# Altium PCB Zybo_Z7_Pcb.PcbDoc (part 8 of 8)
Units mm, origin at the board's own origin, x right, y up, seen from the top; angles counter-clockwise.
Board outline 122 x 88 mm, 8 copper layers (Top Layer, Layer 2, Layer 3, Layer 4, Layer 5, Layer 6, Layer 7, Bottom Layer), stack 1.625 mm thick; 658 components, 558 nets, 2538 pads, 924 vias.
Unrouted connection lines stored in the file: 1229.
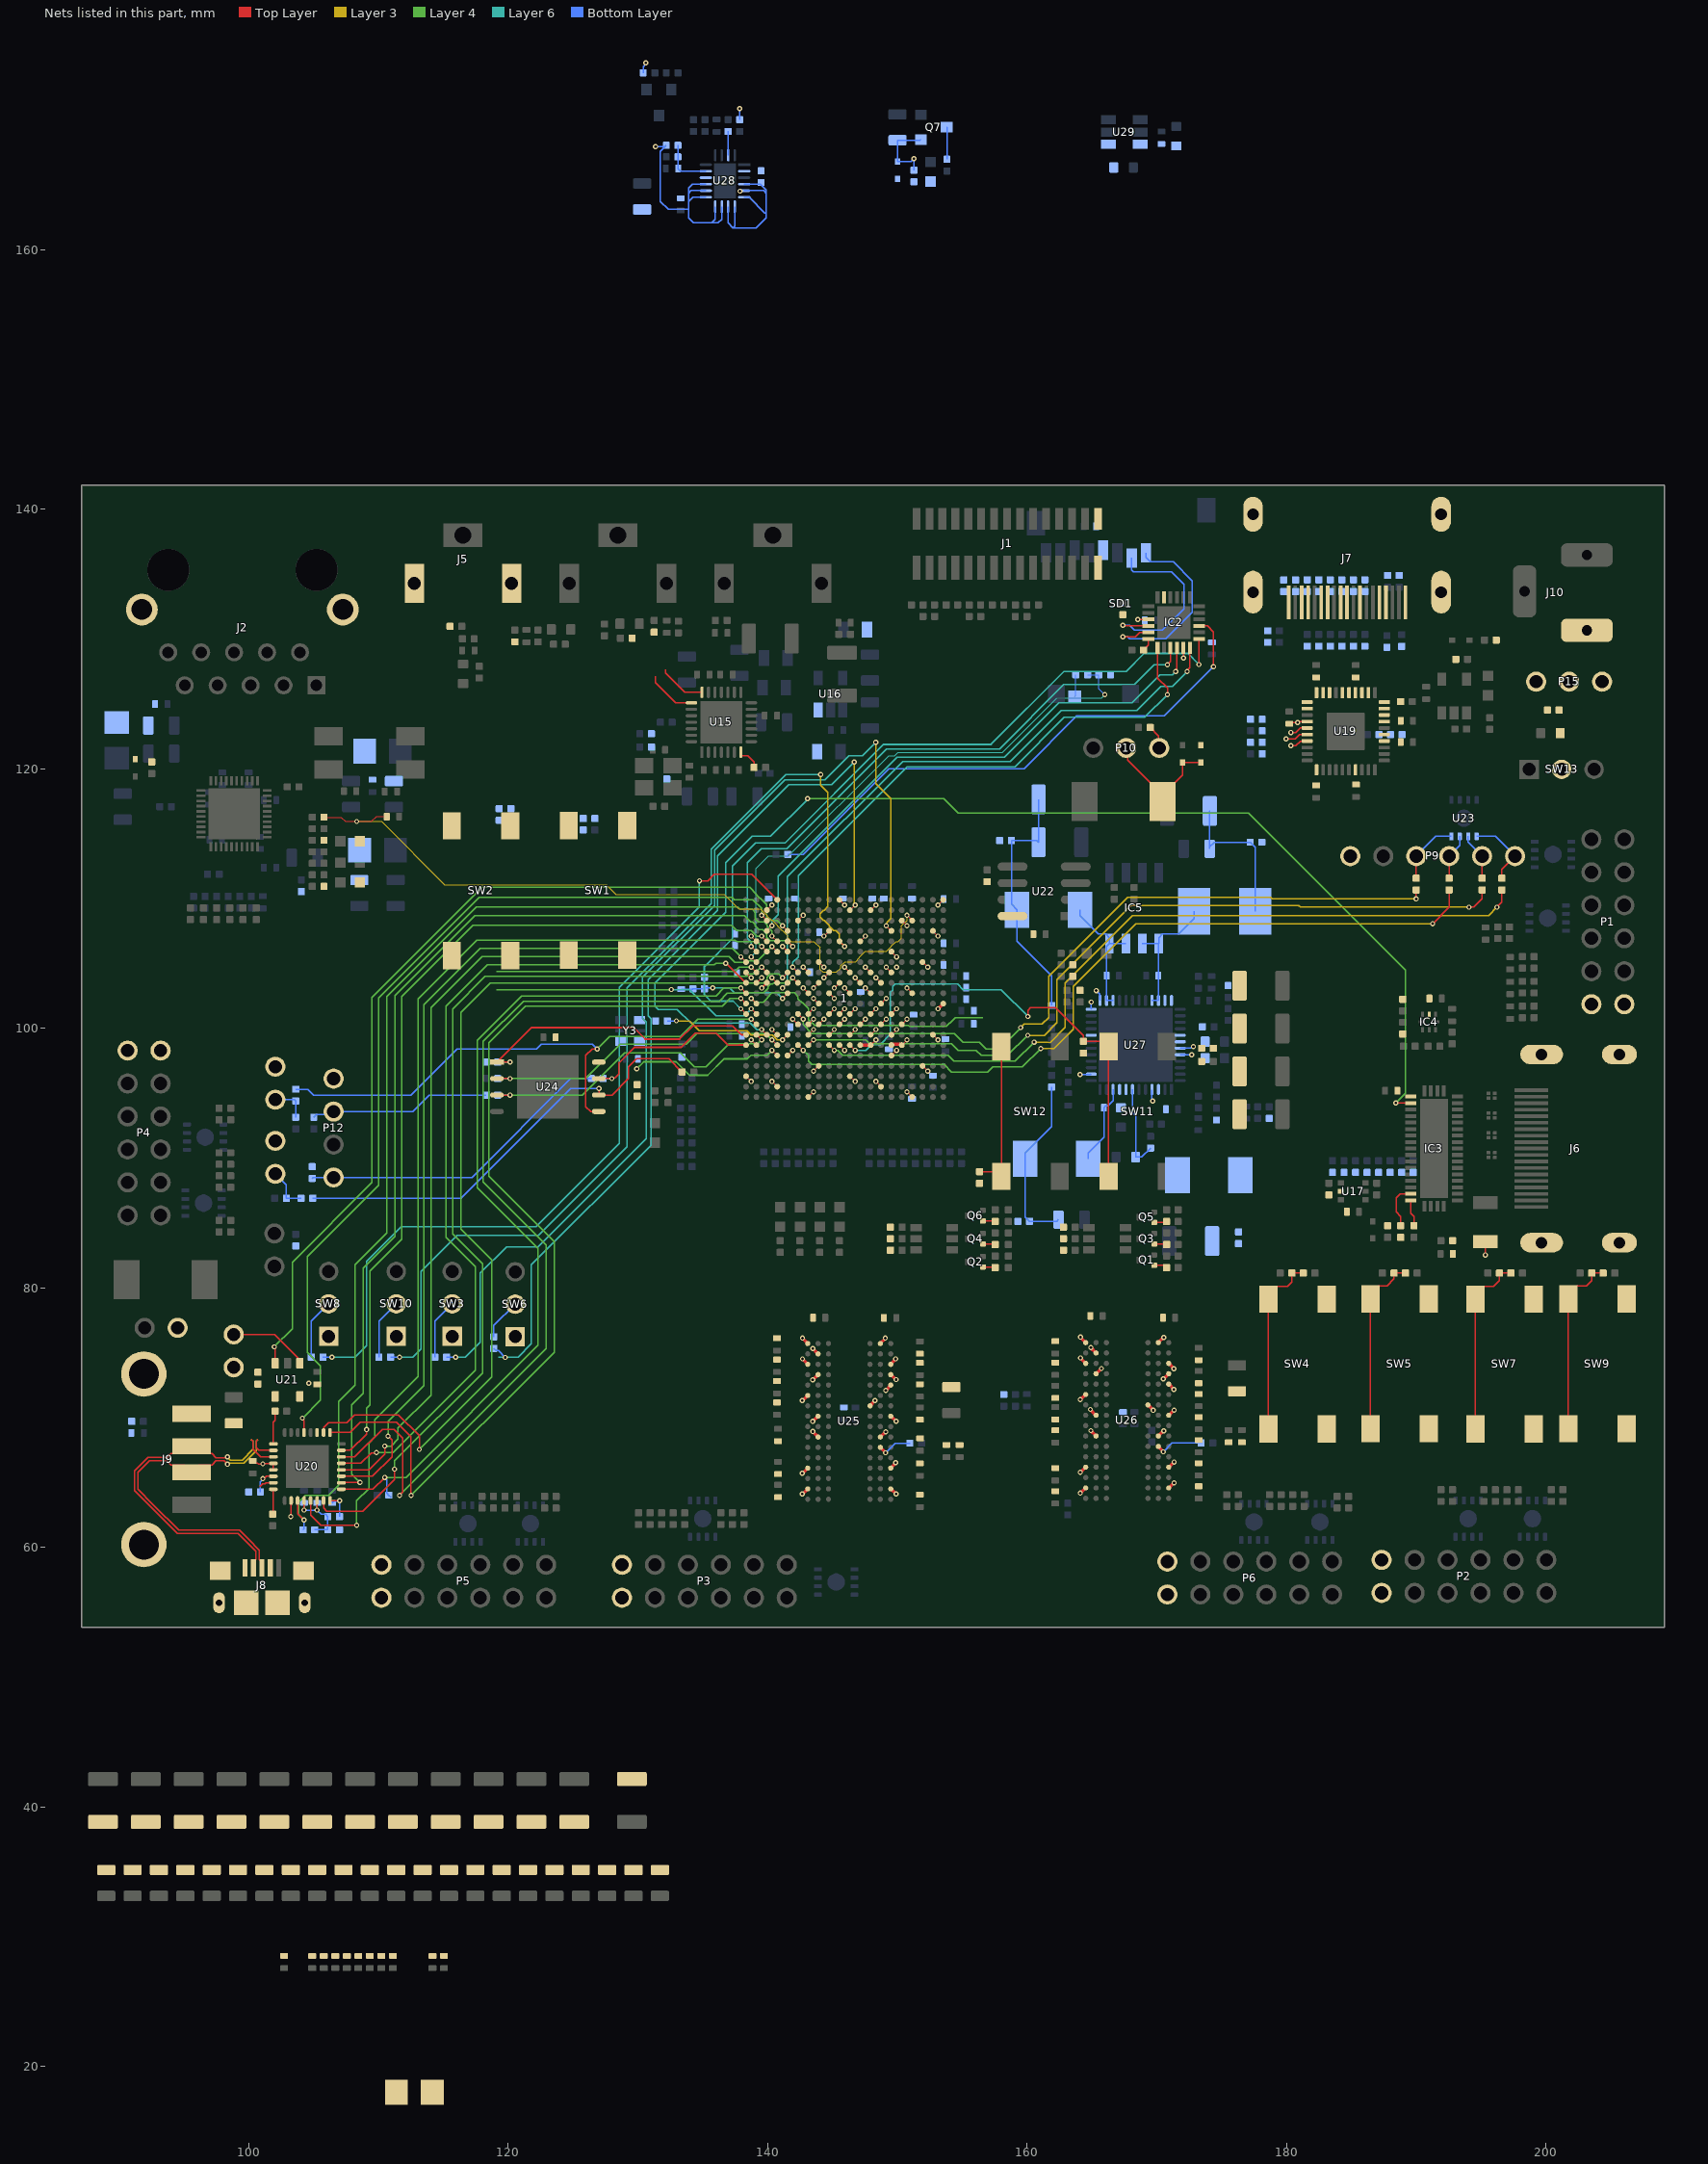
[diagram p13: the nets of this part, all layers, seen from the top]

## Via types
v1: diameter 0.4, hole 0.2, Top Layer to Bottom Layer, 249 vias
v2: diameter 0.4/0.2/0.2/0.2/0.2/0.2/0.2/0.2 (per signal layer), hole 0.2, Top Layer to Bottom Layer, 148 vias
v3: diameter 0.4/0.2/0.4/0.2/0.2/0.2/0.2/0.2 (per signal layer), hole 0.2, Top Layer to Bottom Layer, 136 vias
v4: diameter 0.4/0.2/0.2/0.4/0.2/0.2/0.2/0.2 (per signal layer), hole 0.2, Top Layer to Bottom Layer, 98 vias
v5: diameter 0.4/0.2/0.2/0.2/0.2/0.4/0.2/0.2 (per signal layer), hole 0.2, Top Layer to Bottom Layer, 68 vias
v6: diameter 0.4/0.4/0.2/0.2/0.4/0.2/0.4/0.4 (per signal layer), hole 0.2, Top Layer to Bottom Layer, 62 vias
v7: diameter 0.5, hole 0.2, Top Layer to Bottom Layer, 52 vias
v8: diameter 0.4/0.2/0.2/0.2/0.2/0.2/0.2/0.4 (per signal layer), hole 0.2, Top Layer to Bottom Layer, 31 vias
v9: diameter 0.5, hole 0.3, Top Layer to Bottom Layer, 25 vias
v10: diameter 0.4/0.4/0.2/0.2/0.4/0.4/0.4/0.4 (per signal layer), hole 0.2, Top Layer to Bottom Layer, 20 vias
v11: diameter 0.2/0.2/0.2/0.4/0.2/0.2/0.2/0.4 (per signal layer), hole 0.2, Top Layer to Bottom Layer, 15 vias
v12: diameter 0.2/0.2/0.2/0.2/0.2/0.4/0.2/0.4 (per signal layer), hole 0.2, Top Layer to Bottom Layer, 11 vias
v13: diameter 0.4/0.4/0.4/0.4/0.4/0.4/0.4/0.4 (per signal layer), hole 0.2, Top Layer to Bottom Layer, 5 vias
v14: diameter 0.4/0.2/0.2/0.2/0.2/0.4/0.2/0.4 (per signal layer), hole 0.2, Top Layer to Bottom Layer, 2 vias
v15: diameter 0.2/0.4/0.4/0.4/0.4/0.4/0.4/0.4 (per signal layer), hole 0.2, Top Layer to Bottom Layer, 2 vias

## Nets (pads, with @x,y where several pads share a name; then routed paths per layer and width w, separated by ;. In a path a pad name is that pad's centre, name@x,y a point inside that pad or via, vN(x,y) a via of type N, cw(c..) or ccw(c..) an arc to the next point about the centre after c; other vN are vias at no path point) (continued)
NetIC2_22: IC2.22 SD1.2 | length 14.8
  Top Layer w0.1: v1(167.386,131.064) 167.427,131.023 168.488,131.023 IC2.22@169.353,131.023
  Bottom Layer w0.1: v1(167.386,131.064) 167.894,131.064 168.275,130.683 170.434,130.683 172.085,132.334 172.085,134.23 171.128,135.187 168.216,135.187 168.064,135.339 SD1.2@168.064,136.252
NetIC2_23: IC2.23 SD1.1 | length 15.4
  Top Layer w0.1: v1(167.386,130.175) 168.347,130.175 168.695,130.523 IC2.23@169.353,130.523
  Bottom Layer w0.1: v1(167.386,130.175) 167.767,130.175 167.894,130.048 170.697,130.048 172.72,132.071 172.72,134.493 171.261,135.952 169.514,135.952 169.164,136.302 SD1.1@169.164,136.652
NetIC2_24: IC2.24 R118.2 | length 1
  Top Layer w0.1: R118.2@168.979,129.159 169.353,129.533 IC2.24@169.353,130.023
NetIC3_16: IC3.16 R150.2 | length 3.5
  Top Layer w0.1: R150.2@188.798,84.803 188.798,85.522 188.443,85.877 188.443,86.944 188.753,87.254 IC3.16@189.564,87.254
NetIC3_17: IC3.17 R155.1 | length 2.1
  Top Layer w0.1: IC3.17@189.564,86.754 189.564,85.772 189.814,85.522 R155.1@189.814,84.803
NetJ5_2: J5.2 R129.1
NetJ5_3: J5.3 R131.1
NetJ7_19: J7.19 R156.1
NetP7_2: P7.2 U21.1 | length 6.2
  Top Layer w0.1: P7.2@98.849,76.424 102.024,76.424 103.948,74.499 U21.1@103.948,74.204
NetP10_1: P10.1 R206.2 | length 1.9
  Top Layer w0.1: R206.2@169.487,123.19 170.137,122.54 170.137,121.658 P10.1@170.18,121.615
NetP11_2: P11.2 R251.2 R252.1 | length 2.9
  Bottom Layer w0.1: P11.2@102.057,94.513 103.538,94.513 R252.1@103.632,94.419 R251.2@103.632,93.16
NetP12_1: P12.1 R250.2 R254.1 | length 24.7
  Bottom Layer w0.1: R250.2@104.902,88.45 104.971,88.519 P12.1@106.553,88.519 117.221,88.519 124.841,96.139 R254.1@126.423,96.139
NetP12_3: P12.3 R255.1 R256.1 | length 14
  Bottom Layer w0.1: R256.1@105.029,93.16 105.242,93.373 106.327,93.373 P12.3@106.553,93.599 112.649,93.599 113.919,94.869 R255.1@118.295,94.869
NetP13_2: P13.2 R257.2 R258.1 | length 3.4
  Bottom Layer w0.1: P13.2@102.057,88.798 102.914,87.942 R257.2@102.914,86.919 R258.1@104.046,86.919
NetQ1_1: Q1.1 R74.1 | length 1
  Top Layer w0.1: Q1.1@169.799,81.75 169.809,81.74 170.581,81.74 R74.1@170.748,81.573
NetQ2_1: Q2.1 R76.1 | length 1
  Top Layer w0.1: Q2.1@156.591,81.623 157.49,81.623 R76.1@157.54,81.573
NetQ3_1: Q3.1 R79.1 | length 1
  Top Layer w0.1: Q3.1@169.799,83.401 170.698,83.401 R79.1@170.748,83.351
NetQ4_1: Q4.1 R80.1 | length 1
  Top Layer w0.1: Q4.1@156.591,83.401 157.49,83.401 R80.1@157.54,83.351
NetQ5_1: Q5.1 R81.1 | length 1
  Top Layer w0.1: Q5.1@169.799,85.052 170.671,85.052 R81.1@170.748,85.129
NetQ6_1: Q6.1 R82.1 | length 1
  Top Layer w0.1: Q6.1@156.591,85.179 157.49,85.179 R82.1@157.54,85.129
NetQ7_3: Q7.3 R294.2 | length 2.5
  Bottom Layer w0.1: Q7.3@153.806,169.443 153.822,169.427 R294.2@153.822,166.972
NetR41_1: R41.1 R45.2 SW1.1 SW1.2
NetR42_1: R42.1 R44.2 SW2.1 SW2.2
NetR55_2: R55.2 R69.1 SW4.1 SW4.2 | length 14.1
  Top Layer w0.1: SW4.1@178.598,69.135 SW4.2@178.598,79.135 178.598,79.485 179.248,80.135 180.084,80.135 180.409,80.46 R69.1@180.409,81.153 R55.2@181.287,81.153
NetR56_2: R56.2 SW3.2 | length 4.7
  Bottom Layer w0.1: R56.2@114.358,74.676 114.358,77.441 SW3.2@115.697,78.78
NetR57_2: R57.2 R68.1 SW5.1 SW5.2 | length 14
  Top Layer w0.1: SW5.1@186.472,69.168 SW5.2@186.472,79.168 186.472,79.518 187.122,80.168 187.737,80.168 188.283,80.714 R68.1@188.283,81.153 R57.2@189.161,81.153
NetR59_2: R59.2 R67.1 SW7.1 SW7.2 | length 14.1
  Top Layer w0.1: SW7.1@194.549,69.135 SW7.2@194.549,79.135 194.549,79.485 195.199,80.135 195.959,80.135 196.411,80.587 R67.1@196.411,81.153 R59.2@197.289,81.153
NetR60_2: R60.2 SW6.2 | length 3.2
  Bottom Layer w0.1: R60.2@118.897,76.244 118.897,77.104 SW6.2@120.548,78.755
NetR63_2: R63.2 R66.1 SW9.1 SW9.2 | length 14
  Top Layer w0.1: SW9.2@201.709,79.165 201.709,74.17 201.712,74.167 SW9.1@201.712,69.168 ; SW9.2@201.712,79.168 201.712,79.518 202.362,80.168 203.104,80.168 203.523,80.587 R66.1@203.523,81.153 R63.2@204.401,81.153
NetR64_2: R64.2 SW8.2 | length 4.7
  Bottom Layer w0.1: R64.2@104.833,74.676 104.833,77.441 SW8.2@106.172,78.78
NetR70_2: R70.2 SW10.2 | length 4.7
  Bottom Layer w0.1: R70.2@110.04,74.676 110.04,77.441 SW10.2@111.379,78.78
NetR116_1: R116.1 SD1.9 | length 1.7
  Bottom Layer w0.09: SD1.9@163.664,125.567 163.761,125.664 R116.1@163.761,127.254
NetR123_2: R123.2 U15.7 | length 1.9
  Top Layer w0.1: U15.7@137.939,121.286 137.939,121.077 138.005,121.012 138.475,121.012 138.945,120.541 R123.2@138.945,120.117
NetR124_2: R124.2 U15.22 | length 3.9
  Top Layer w0.1: 131.359,127.152 131.359,126.644 132.907,125.096 U15.22@134.129,125.096
NetR125_2: R125.2 U15.21 | length 3.7
  Top Layer w0.1: 132.121,127.66 132.121,127.406 133.621,125.907 U15.21@134.939,125.907
NetR167_1: R167.1 R172.2 U19.25
NetR168_1: R168.1 R173.2 U19.7 | length 1.4
  Top Layer w0.1: v1(180.34,121.793) 180.721,121.793 181.068,122.14 181.573,122.14 U19.7@181.585,122.151
NetR169_1: R169.1 U19.5 | length 1.4
  Top Layer w0.1: v1(180.34,122.809) 180.721,122.809 181.063,123.151 U19.5@181.585,123.151
NetR170_2: R170.2 U19.30
NetR174_2: R174.2 U19.6 | length 1.8
  Top Layer w0.1: v1(179.959,122.301) 180.66,122.301 181.01,122.651 U19.6@181.585,122.651
NetR189_1: R189.1 U20.22 | length 2
  Top Layer w0.1: v1(101.093,65.309) 101.174,65.309 101.36,65.495 U20.22@101.906,65.495
  Bottom Layer w0.1: R189.1@100.908,64.293 100.908,65.043 101.093,65.228 v1(101.093,65.309)
NetR192_1: R192.1 U20.17 U21.4 | length 2.6
  Top Layer w0.1: U20.17@101.906,67.995 101.906,69.658 102.04,69.792 R192.1@102.04,70.516
NetR195_1: R195.1 U20.24 | length 1.9
  Top Layer w0.1: R195.1@101.855,62.584 101.881,62.61 101.881,64.47 U20.24@101.906,64.495
NetR253_2: R253.2 Y3.4
NetR268_2: R268.2 U25.L8 | length 2.7
  Top Layer w0.254: U25.L8@148.712,67.705 v6@149.094,67.323
  Bottom Layer w0.1: v6(149.094,67.305) 149.836,68.047 R268.2@150.967,68.047
NetR269_2: R269.2 U26.L8 | length 3.7
  Top Layer w0.254: U26.L8@170.116,67.777 v6@170.498,67.396
  Bottom Layer w0.1: v6(170.498,67.377) 171.183,68.062 R269.2@173.412,68.062
OTG_CLK: 1.A11 R191.1 U20.1 | length 69.5
  Top Layer w0.05: v4(137.942,103.118) 1.A11@138.342,102.718
  Top Layer w0.1: U20.1@107.146,64.495 109.577,64.495 v4(110.491,65.409)
  Layer 4 w0.1: v4(110.491,65.409) 112.145,65.409 122.316,75.58 122.316,83.046 117.634,87.728 117.634,99.092 121.031,102.489 136.017,102.489 136.639,103.111 v4@137.942,103.111
  Bottom Layer w0.1: v4(110.491,65.409) 110.491,65.39 110.658,65.223 110.658,64.195 R191.1@110.814,64.039 R191.1@110.98,63.874
OTG_D_N: J8.2 J9.2 U20.19 | length 27.5
  Top Layer w0.1: J9.2@95.607,67.806 95.042,67.241 94.035,67.241 93.754,66.96 92.26,66.96 91.214,65.913 91.214,64.389 94.515,61.087 99.187,61.087 100.572,59.702 100.572,59.103 100.372,58.903 J8.2@100.372,58.428 ; J9.2@96.172,67.241 97.179,67.241 97.487,66.933 v1@98.369,66.933 ; v1(98.369,66.979) v1@98.396,67.005 ; 100.204,68.33 100.331,68.203 100.331,67.595 100.931,66.995 U20.19@101.906,66.995
  Layer 3 w0.1: v1(98.369,66.979) 98.603,66.746 99.508,66.746 100.331,67.568 100.331,68.203 100.204,68.33
OTG_D_P: J8.3 J9.3 U20.18 | length 27.1
  Top Layer w0.1: J9.3@95.607,65.806 95.042,66.371 94.035,66.371 93.696,66.71 92.364,66.71 91.464,65.81 91.464,64.492 92.622,63.334 92.71,63.246 94.619,61.337 99.291,61.337 99.91,60.717 99.999,60.629 100.822,59.806 100.822,59.103 101.022,58.903 J8.3@101.022,58.428 ; J9.3@96.172,66.371 97.179,66.371 97.487,66.679 98.112,66.679 v1(98.369,66.422) ; 100.712,68.33 100.585,68.203 100.585,67.695 100.785,67.495 U20.18@101.906,67.495
  Layer 3 w0.1: v1(98.369,66.422) 98.451,66.422 98.537,66.509 99.63,66.509 100.581,67.459 100.581,68.199 100.712,68.33
OTG_DATA0: 1.A14 U20.3 | length 67.7
  Top Layer w0.05: v4(137.942,105.518) 1.A14@138.342,105.118
  Top Layer w0.1: U20.3@107.146,65.495 109.553,65.495 111.052,66.994 111.052,68.277 v4(110.745,68.584)
  Layer 4 w0.1: v4(110.745,68.584) 110.745,69.724 113.507,72.486 113.507,101.823 117.856,106.172 137.281,106.172 v4@137.942,105.511
OTG_DATA1: 1.D15 U20.4 | length 69.2
  Top Layer w0.05: v4(140.342,106.318) 1.D15@140.742,105.918
  Top Layer w0.1: U20.4@107.146,65.995 109.272,65.995 110.491,67.214 v4(110.491,67.822)
  Layer 4 w0.1: v4(110.491,67.822) 110.973,67.822 111.506,68.355 111.506,69.215 114.046,71.755 114.046,101.6 117.983,105.537 137.033,105.537 137.459,105.111 138.342,105.111 138.442,105.211 139.235,105.211 v4(140.342,106.318)
OTG_DATA2: 1.A12 U20.5 | length 67.4
  Top Layer w0.1: U20.5@107.146,66.495 108.656,66.495 109.456,67.295 109.837,67.295 v4(109.856,67.314) ; v4(136.779,105.029) 136.805,105.029 138.316,103.518 1.A12@138.339,103.518
  Layer 4 w0.1: v4(109.856,67.314) 111.129,67.314 117.49,73.675 117.49,81.649 115.219,83.92 115.219,101.724 118.398,104.902 135.89,104.902 136.017,105.029 v4(136.779,105.029)
OTG_DATA3: 1.F12 U20.6 | length 78.7
  Top Layer w0.05: v4(141.942,103.918) 1.F12@142.342,103.518
  Top Layer w0.1: U20.6@107.146,66.995 108.182,66.995 110.301,69.114 111.196,69.114 111.885,68.425 111.885,64.264 v4(111.634,64.012)
  Layer 4 w0.1: v4(111.634,64.012) 122.942,75.321 122.942,83.306 118.077,88.171 118.077,98.996 121.189,102.108 136.271,102.108 136.874,102.711 138.108,102.711 138.139,102.743 139.7,102.743 140.042,103.085 140.042,103.236 140.218,103.411 140.368,103.411 140.475,103.518 141.549,103.518 v4@141.942,103.911
OTG_DATA4: 1.C16 U20.7 | length 68.2
  Top Layer w0.05: v4(139.542,107.118) 1.C16@139.942,106.718
  Top Layer w0.1: U20.7@107.146,67.495 107.838,67.495 109.094,68.75 v4(109.094,69.092)
  Layer 4 w0.1: v4(109.094,69.092) 109.094,70.74 109.347,70.993 109.347,81.315 111.791,83.758 111.791,102.46 117.281,107.95 137.199,107.95 137.618,107.531 138.753,107.531 139.166,107.118 v4(139.542,107.118)
OTG_DATA5: 1.A10 U20.9 | length 74.5
  Top Layer w0.05: v4(137.942,102.318) 1.A10@138.342,101.918
  Top Layer w0.1: U20.9@106.276,68.865 107.824,68.865 108.627,69.668 111.389,69.668 112.523,68.534 v4(112.523,64.012)
  Layer 4 w0.1: v4(112.523,64.012) 123.571,75.06 123.571,83.566 118.522,88.615 118.522,98.902 121.347,101.727 136.525,101.727 137.109,102.311 v4@137.942,102.311
OTG_DATA6: 1.E13 U20.10 | length 73.7
  Top Layer w0.05: v4(141.142,103.918) 1.E13@141.542,104.318
  Top Layer w0.1: U20.10@105.776,68.865 105.801,68.89 105.801,69.255 106.173,69.627 107.57,69.627 108.178,70.235 111.551,70.235 113.158,68.629 v4(113.158,67.568)
  Layer 4 w0.1: v4(113.158,67.568) 118.745,73.155 118.745,82.169 116.363,84.551 116.363,101.25 118.618,103.505 137.77,103.505 137.776,103.511 138.108,103.511 138.114,103.505 139.7,103.505 139.958,103.763 139.958,103.963 140.217,104.222 140.845,104.222 141.149,103.918 v4@141.138,103.907
OTG_DATA7: 1.C18 U20.13 | length 71
  Top Layer w0.05: v4(139.542,108.718) 1.C18@139.942,108.318
  Top Layer w0.1: v1(104.14,69.977) 104.14,69.896 104.276,69.76 U20.13@104.276,68.865
  Layer 4 w0.1: v1(104.14,69.977) 105.537,71.374 105.537,74.02 104.521,75.036 104.521,82.423 110.013,87.915 110.013,102.362 117.76,110.109 137.273,110.109 137.446,109.935 138.858,109.935 139.542,109.251 v4(139.542,108.718)
OTG_DIR: 1.C13 U20.31 | length 72.9
  Top Layer w0.05: v4(139.542,104.718) 1.C13@139.942,104.318
  Top Layer w0.1: U20.31@105.776,63.625 105.776,63.039 106.014,62.802 108.802,62.802 111.253,65.253 v4(111.253,66.044)
  Layer 4 w0.1: v4(111.253,66.044) 111.253,66.676 118.029,73.452 118.029,81.872 115.727,84.174 115.727,101.513 118.227,104.013 138.417,104.013 138.619,104.214 138.995,104.214 v4@139.533,104.753
OTG_ID: J8.4 U20.23 | length 1.2
  Top Layer w0.1: 100.839,64.674 101.074,64.909 101.259,64.909 101.345,64.995 U20.23@101.906,64.995
OTG_NXT: 1.E16 U20.2 | length 75.6
  Top Layer w0.05: 1.E16@141.542,106.718 v4(141.942,106.318)
  Top Layer w0.1: U20.2@107.146,64.995 107.163,65.012 108.569,65.012 v4(108.586,65.028)
  Layer 4 w0.1: v4(108.586,65.028) 107.95,65.664 107.95,70.993 108.839,71.882 108.839,81.525 111.283,83.969 111.283,102.554 117.44,108.712 138.225,108.712 138.719,108.218 138.866,108.218 139.042,108.042 139.042,107.916 139.34,107.618 139.612,107.618 139.942,107.288 139.942,107.012 140.203,106.751 141.515,106.751 v4@141.941,106.325
OTG_OC: 1.E17 R190.2 U21.3 | length 68.9
  Top Layer w0.05: v4(141.142,107.918) 1.E17@141.542,107.518
  Top Layer w0.1: v1(101.982,75.469) 102.048,75.403 U21.3@102.048,74.204
  Layer 4 w0.1: v1(101.982,75.469) 103.378,76.865 103.378,81.998 109.505,88.125 109.505,102.393 117.983,110.871 138.613,110.871 139.142,110.342 139.142,110.294 139.418,110.018 139.461,110.018 139.942,109.537 139.942,108.597 140.219,108.32 140.734,108.32 v4@141.142,107.911
OTG_RESETN: 1.D16 R194.1 U20.27 | length 81.5
  Top Layer w0.05: v4(140.342,107.118) 1.D16@140.742,106.718
  Top Layer w0.1: U20.27@103.776,63.625 103.776,62.626 v4(104.268,62.134)
  Layer 4 w0.1: v4(104.268,62.134) 103.876,62.526 103.876,63.52 104.395,64.039 106.173,64.039 106.935,64.801 106.935,71.248 108.204,72.517 108.204,81.788 110.648,84.232 110.648,102.458 117.537,109.347 137.682,109.347 137.87,109.159 138.847,109.159 139.042,108.965 139.042,108.474 139.292,108.224 139.729,108.224 139.973,107.98 139.973,107.874 140.042,107.805 140.042,107.794 140.218,107.618 140.229,107.618 140.35,107.497 140.35,107.119 v4@140.342,107.111
  Bottom Layer w0.1: R194.1@104.199,61.372 104.268,61.441 v4(104.268,62.134)
OTG_STP: 1.C15 U20.29 | length 76.6
  Top Layer w0.05: v4(139.542,106.318) 1.C15@139.942,105.918
  Top Layer w0.1: U20.29@104.776,63.625 104.776,62.515 105.565,61.726 v4(108.332,61.726)
  Layer 4 w0.1: v4(108.332,61.726) 108.332,63.624 109.263,64.556 109.263,68.082 109.728,68.547 109.728,69.85 113.058,73.18 113.058,102.263 117.602,106.807 137.49,106.807 137.611,106.687 139.167,106.687 v4@139.542,106.311
OUT1: C211.2 C212.1 L6.2 R276.2 R278.2 | length 11.8
  Bottom Layer w0.1: C212.1@174.091,116.764 174.076,116.749 C211.2@174.076,114.005 ; L6.2@177.585,109.017 177.585,113.964 R278.2@177.198,114.351 174.422,114.351 C211.2@174.076,114.005 ; C211.2@174.076,114.005 C211.2@174.076,113.843 C211.2@174.076,114.005
OUT2: C216.1 C217.1 L7.2 R284.2 R286.2 | length 19.4
  Bottom Layer w0.1: C216.1@160.885,117.653 C217.1@160.885,114.351 160.758,114.478 R284.2@158.794,114.478 158.794,109.57 L7.2@159.22,109.144 159.22,106.743 161.9,104.064 R286.2@161.9,101.778
OUT3: C220.1 L8.2 R290.2 R291.2
OUT4: C223.2 L9.2 R296.2 R297.2 | length 13.6
  Bottom Layer w0.1: R297.2@161.9,95.486 161.9,92.454 159.855,90.409 L9.2@159.855,89.967 159.855,85.476 R296.2@160.191,85.141 162.297,85.141 C223.2@162.424,85.268
OVP: C227.2 R301.1 R303.2 U28.15 | length 4
  Bottom Layer w0.1: R301.1@133.089,168.046 R303.2@133.089,167.157 133.114,167.132 C227.2@133.114,166.268 133.114,166.231 133.288,166.056 U28.15@135.237,166.056
PB0: 1.B13 R41.2 | length 20.3
  Top Layer w0.05: v4(138.742,104.718) 1.B13@139.142,104.318
  Layer 4 w0.1: 119.126,104.394 137.49,104.394 137.808,104.711 v4@138.742,104.711
PB1: 1.B9 R42.2 | length 21.2
  Top Layer w0.05: v5(138.742,101.518) 1.B9@139.142,101.118
  Layer 4 w0.1: 119.126,102.997 v1(132.588,102.997)
  Layer 6 w0.1: v1(132.588,102.997) 133.985,102.997 136.017,100.965 138.196,100.965 v5@138.742,101.511
PG_ALL: C224.2 D18.2 Q7.1 R293.2 U27.20 | length 5.7
  Bottom Layer w0.1: R293.2@151.282,166.141 v1(151.282,167.03) 151.053,166.801 D18.2@150.012,166.801 C224.2@150.012,168.443 151.756,168.443 Q7.1@151.806,168.493
PG_ALL_EDGE: 1.C7 IC3.2 U16.3 | length 94.5
  Top Layer w0.05: v5(139.542,99.918) 1.C7@139.942,99.518
  Top Layer w0.1: v1(188.417,94.259) 189.558,94.259 IC3.2@189.564,94.254
  Layer 4 w0.1: v1(143.078,117.704) 153.568,117.704 154.686,116.586 177.069,116.586 189.154,104.501 189.154,94.996 v1(188.417,94.259)
  Layer 6 w0.1: v5@139.542,99.911 139.17,99.911 138.67,100.411 134.099,100.411 133.037,101.473 131.572,101.473 131.318,101.727 131.318,103.505 136.779,108.966 136.779,112.776 138.802,114.799 140.225,114.799 143.078,117.653 v1(143.078,117.704)
PGOOD: R304.1 U28.2
PROG_B: 1.L6 R201.1 SW11.3 SW11.4 | length 37.4
  Top Layer w0.05: 1.L6@146.342,98.718 v5(146.742,98.318)
  Top Layer w0.1: v1(160.059,100.926) 160.059,101.385 160.274,101.6 162.179,101.6 164.338,99.441 R201.1@164.338,99.002 165.876,99.002 SW11.3@166.279,98.599 SW11.4@166.279,88.599
  Layer 6 w0.1: v5(146.742,98.318) 147.567,98.318 148.015,98.766 148.669,98.766 149.454,99.551 149.454,102.779 149.629,102.954 149.629,103.237 149.816,103.425 154.639,103.425 155.067,102.997 157.988,102.997 v1(160.059,100.926)
PS_CLK: 1.E7 R253.1 | length 10.1
  Top Layer w0.05: v3(141.142,99.118) 1.E7@141.542,99.518
  Layer 3 w0.1: v1(132.969,100.584) 133.985,100.584 134.747,99.822 138.411,99.822 138.722,99.511 140.355,99.511 140.455,99.411 140.466,99.411 140.642,99.236 140.642,99.224 140.748,99.118 v3@141.149,99.118
  Bottom Layer w0.1: R253.1@132.276,100.584 v1(132.969,100.584)
PS_RST: 1.B10 R249.1 SW12.1 SW12.2 | length 32.7
  Top Layer w0.05: v4(138.742,102.318) 1.B10@139.142,101.918
  Top Layer w0.1: R249.1@156.337,88.969 157.654,88.969 SW12.1@158.024,88.599 SW12.2@158.024,98.599
  Layer 4 w0.1: v4@138.742,102.311 139.035,102.018 139.673,102.018 140.011,102.356 140.011,102.405 140.349,102.743 142.089,102.743 142.353,102.479 142.353,102.284 142.676,101.961 142.72,101.961 143.142,101.54 143.142,100.698 143.62,100.22 150.869,100.22 150.921,100.168 153.761,100.168 154.011,100.418 154.06,100.418 154.48,100.838 156.595,100.838
  other v1: 137.871,164.516
PWR_SW1: C208.2 IC5.5 IC5.6 L6.1 U27.33 U27.34 | length 10.5
  Bottom Layer w0.1: IC5.6@168.885,106.559 IC5.5@170.155,106.559 ; U27.33@169.627,102.158 U27.34@170.127,102.158 170.127,104.059 C208.2@170.122,104.064 170.122,106.526 IC5.5@170.155,106.559 ; L6.1@172.885,109.017 172.885,108.471 171.685,107.271 170.43,107.271 170.155,106.996 IC5.5@170.155,106.559
PWR_SW2: C215.1 IC5.7 IC5.8 L7.1 U27.26 U27.27 | length 10.1
  Bottom Layer w0.1: L7.1@164.071,109.144 164.071,108.701 165.501,107.271 166.07,107.271 166.345,106.996 IC5.8@166.345,106.559 ; U27.27@166.627,102.158 U27.26@166.127,102.158 166.127,104.061 C215.1@166.124,104.064 166.124,106.338 IC5.8@166.345,106.559 ; IC5.7@167.615,106.559 IC5.8@166.345,106.559
PWR_SW3: C218.2 L8.1 U27.3
PWR_SW4: C221.2 L9.1 U27.10 | length 6.2
  Bottom Layer w0.1: L9.1@164.706,89.967 164.706,90.409 165.931,91.634 C221.2@165.931,93.904 166.058,94.031 166.218,94.031 166.627,94.44 U27.10@166.627,95.302
RT: R275.1 U27.41
RX0_N: J7.9 R178.1 U19.35
RX0_P: J7.7 R177.1 U19.36
RX1_N: J7.6 R180.1 U19.38
RX1_P: J7.4 R179.1 U19.39
RX2_N: J7.3 R182.1 U19.1
RX2_P: J7.1 R181.1 U19.2
RX_SCL: J7.15 R185.1 U19.29
RX_SDA: J7.16 R186.1 U19.28
RXC_N: J7.12 R176.1 U19.32
RXC_P: J7.10 R175.1 U19.33
SD_CCLK: IC2.9 R234.1 | length 42.8
  Top Layer w0.1: IC2.9@173.253,131.023 173.904,131.023 174.371,130.556 v1(174.371,127.889)
  Bottom Layer w0.1: R234.1@141.547,113.411 142.748,113.411 149.352,120.015 159.766,120.015 163.83,124.079 170.561,124.079 v1(174.371,127.889)
SD_CD: 1.B14 R116.2 R117.1 | length 42.5
  Top Layer w0.05: v5(138.742,105.518) 1.B14@139.142,105.118
  Layer 6 w0.09: v5(138.742,105.518) 139.124,105.9 139.124,112.327 140.081,113.284 141.605,113.284 149.352,121.031 149.786,121.031 150.04,121.285 158.115,121.285 162.306,125.476 165.735,125.476 v1(165.989,125.73)
  Bottom Layer w0.09: R116.2@164.661,127.254 R117.1@165.539,127.254 165.539,126.18 v1(165.989,125.73)
SD_CMD: 1.C17 IC2.4 | length 43.6
  Top Layer w0.05: 1.C17@139.942,107.518 v5(140.342,107.918)
  Top Layer w0.1: v1(171.45,127.508) 171.45,127.589 171.553,127.692 IC2.4@171.553,129.323
  Layer 6 w0.1: v5@140.335,107.918 140.335,108.28 140.808,108.753 140.808,111.725 149.987,120.904 158.242,120.904 162.433,125.095 168.092,125.095 170.251,127.254 171.196,127.254 v1(171.45,127.508)
SD_D0: 1.E12 IC2.6 | length 48.6
  Top Layer w0.05: v5(141.142,103.118) 1.E12@141.542,103.518
  Top Layer w0.1: v1(172.339,127.508) 172.339,127.575 172.553,127.789 IC2.6@172.553,129.323
  Layer 6 w0.1: v5@141.145,103.118 141.531,103.504 141.531,111.686 150.419,120.574 158.699,120.574 162.642,124.516 168.458,124.516 170.307,126.365 171.196,126.365 v1(172.339,127.508)
SD_D1: 1.A9 IC2.7 | length 59.7
  Top Layer w0.05: v5(137.942,101.518) 1.A9@138.342,101.118
  Top Layer w0.1: v1(173.253,128.041) IC2.7@173.253,130.023
  Layer 6 w0.131: v5@137.942,101.511 137.345,102.108 135.636,102.108 135.128,102.616 135.128,104.775 137.287,106.934 137.287,112.522 139.065,114.3 141.351,114.3 148.946,121.895 157.226,121.895 162.839,127.508 167.64,127.508 169.037,128.905 172.389,128.905 v1(173.253,128.041)
SD_D2: 1.F13 IC2.1 | length 45.9
  Top Layer w0.05: v5(141.942,104.718) 1.F13@142.342,104.318
  Top Layer w0.1: IC2.1@170.053,129.323 170.053,127 170.815,126.238 v1(170.815,125.73)
  Layer 6 w0.1: v5@141.942,104.711 141.942,105.087 142.367,105.512 142.367,111.76 150.774,120.167 159.055,120.167 162.865,123.978 169.063,123.978 v1(170.815,125.73)
SD_D3: 1.B15 IC2.3 | length 47.3
  Top Layer w0.05: v5(138.742,106.318) 1.B15@139.142,105.918
  Top Layer w0.1: v1(170.815,128.016) 170.815,128.035 171.053,128.273 IC2.3@171.053,129.323
  Layer 6 w0.1: v5@138.742,106.311 138.742,106.669 138.441,106.97 138.441,112.787 139.52,113.866 141.491,113.866 149.164,121.539 157.883,121.539 162.836,126.492 168.275,126.492 169.799,128.016 v1(170.815,128.016)
SHIELD: C70.1 J2.15 J2.16 J8.6 J8.7 J8.8 J8.9 J8.10 J8.11 J9.5 J9.6 R193.2
SPI_CS: 1.A7 R204.1 U24.1 | length 23.3
  Top Layer w0.1: U24.1@119.137,97.409 v1(120.142,97.409)
  Top Layer w0.131: U24.1@119.137,97.409 121.804,100.076 129.667,100.076 130.556,99.187 133.223,99.187 134.239,100.203 137.287,100.203 137.972,99.518 1.A7@138.342,99.518
  Bottom Layer w0.1: R204.1@119.195,97.409 v1(120.142,97.409)
SPI_DQ0/MODE0: 1.B8 R252.2 U24.5 | length 44.8
  Top Layer w0.05: v4(138.742,100.718) 1.B8@139.142,100.318
  Top Layer w0.1: v1(126.873,98.425) 126.492,98.425 125.984,97.917 125.984,93.98 126.365,93.599 U24.5@126.989,93.599
  Layer 4 w0.1: v1(126.873,98.425) 127.838,99.39 133.299,99.39 134.62,100.711 v4@138.742,100.711
  Bottom Layer w0.1: R252.2@103.632,95.319 104.579,95.319 105.029,94.869 112.522,94.869 116.078,98.425 122.174,98.425 122.555,98.806 126.492,98.806 v1(126.873,98.425)
SPI_DQ1/MODE1: 1.D6 R246.2 U24.2 | length 24.4
  Top Layer w0.05: v4(140.342,99.118) 1.D6@140.742,98.718
  Top Layer w0.1: U24.2@119.137,96.139 v1(120.142,96.139)
  Layer 4 w0.1: v1(120.142,96.139) 125.984,96.139 128.651,98.806 133.731,98.806 134.536,99.611 139.827,99.611 140.327,99.111 v4@140.342,99.111
  Bottom Layer w0.1: R246.2@119.195,96.139 v1(120.142,96.139)
SPI_DQ2/MODE2: 1.B7 R255.2 U24.3 | length 24.6
  Top Layer w0.05: 1.B7@139.142,99.518 v4(139.542,99.118)
  Top Layer w0.1: U24.3@119.137,94.869 v1(120.142,94.869)
  Layer 4 w0.1: v1(120.142,94.869) 125.73,94.869 128.981,98.12 133.274,98.12 134.366,97.028 135.255,97.028 137.049,98.822 139.239,98.822 v4@139.542,99.125
  Bottom Layer w0.1: R255.2@119.195,94.869 v1(120.142,94.869)
SPI_DQ3/MODE3: 1.A6 R254.2 U24.7 | length 14.4
  Top Layer w0.1: U24.7@126.989,96.139 v1(127.993,96.139) 128.042,96.188 128.239,96.188 128.55,96.499 128.55,97.352
  Top Layer w0.131: 128.55,97.352 129.75,98.552 133.35,98.552 134.442,99.644 136.017,99.644 136.943,98.718 137.761,98.718 137.77,98.727 138.333,98.727 1.A6@138.342,98.718
  Bottom Layer w0.1: R254.2@127.323,96.139 v1(127.993,96.139)
SPI_SCK/MODE4: R218.1 R258.2 U24.6 | length 34.6
  Top Layer w0.1: v1(127,95.377) 127,94.88 U24.6@126.989,94.869 128.016,94.869 129.286,96.139 129.286,97.028 129.921,97.663 132.392,97.663 R218.1@133.408,96.647
  Bottom Layer w0.1: R258.2@104.946,86.919 116.383,86.919 124.841,95.377 v1(127,95.377)
SPI_SCLK_FB/VCFG1: 1.D5 R243.2 | length 12.4
  Top Layer w0.05: v4(140.342,98.318) 1.D5@140.742,97.918
  Layer 4 w0.131: v1(129.921,96.901) 130.454,97.434 132.944,97.434 133.832,96.546 133.985,96.393 135.382,96.393 136.652,97.663 138.447,97.663 138.718,97.933 139.964,97.933 v4@140.342,98.311
SW0: 1.R17 R56.1 | length 81.3
  Top Layer w0.05: v3(149.142,107.918) 1.R17@149.542,107.518
  Layer 3 w0.1: v1(148.336,122.047) 148.336,118.872 149.501,117.707 149.501,108.48 149.185,108.164 149.185,107.954 v3@149.142,107.911
  Layer 6 w0.1: v1(115.951,74.676) 116.713,74.676 117.856,75.819 117.856,81.153 119.888,83.185 122.301,83.185 130.632,91.516 130.632,100.508 130.361,100.779 130.361,103.945 135.907,109.491 135.907,113.728 141.331,119.151 144.413,119.151 146.264,121.002 147.291,121.002 v1(148.336,122.047)
  Bottom Layer w0.1: R56.1@115.258,74.676 v1(115.951,74.676)
SW1: 1.K16 R70.1 | length 80.1
  Top Layer w0.05: 1.K16@145.542,106.718 v3(145.942,106.318)
  Layer 3 w0.1: v1(144.094,119.558) 144.094,118.745 144.642,118.197 144.642,109.394 144.366,109.118 144.318,109.118 144.042,108.842 144.042,108.594 144.318,108.318 144.366,108.318 144.732,107.953 144.732,107.897 145.097,107.532 145.287,107.532 145.542,107.277 145.542,106.725 v3@145.942,106.325
  Layer 6 w0.1: v1(111.633,74.676) 112.649,74.676 113.284,75.311 113.284,81.28 116.078,84.074 122.346,84.074 129.159,90.887 129.159,103.124 135.67,109.635 135.67,113.826 141.402,119.558 v1(144.094,119.558)
  Bottom Layer w0.1: R70.1@110.94,74.676 v1(111.633,74.676)
SW2: 1.D20 R64.1 | length 63.3
  Top Layer w0.1: v1(134.747,111.379) 135.382,111.379 135.89,111.887 138.773,111.887 1.D20@140.742,109.918
  Layer 6 w0.1: v1(106.426,74.676) 108.204,74.676 109.093,75.565 109.093,82.042 111.76,84.709 122.155,84.709 128.575,91.129 128.575,103.175 134.747,109.347 v1(134.747,111.379)
  Bottom Layer w0.1: R64.1@105.733,74.676 v1(106.426,74.676)
SW3: 1.L19 R60.1 | length 73
  Top Layer w0.05: 1.L19@146.342,109.118 v3(146.742,109.518)
  Layer 3 w0.1: v1(146.685,120.523) 146.685,109.602 146.742,109.545 v3(146.742,109.518)
  Layer 6 w0.1: 119.253,74.676 120.777,74.676 121.793,75.692 121.793,81.788 131.013,91.008 131.013,100.762 130.81,100.965 130.81,103.759 136.144,109.093 136.144,113.284 141.63,118.77 144.932,118.77 v1(146.685,120.523)
  Bottom Layer w0.1: R60.1@118.897,75.344 119.06,75.181 119.256,75.181 v1(119.786,74.651)
SW_EN: C210.2 R273.2 SW13.2 U28.14
SYNC: R271.1 R272.1 U27.43 | length 1.1
  Bottom Layer w0.1: U27.43@171.827,98.458 171.849,98.48 172.617,98.48 172.74,98.603 v1(172.822,98.603)
SYSCLK: 1.U18 C14.2 R114.2 | length 56.8
  Top Layer w0.05: v3(150.742,108.718) 1.U18@151.142,108.318
  Top Layer w0.09: R114.2@105.809,116.281 107.112,116.281 107.442,115.951 v1(108.331,115.951) 109.474,115.951 109.855,116.332 C14.2@110.65,116.332
  Layer 3 w0.09: v1(108.331,115.951) 110.236,115.951 115.113,111.074 127.584,111.074 128.321,110.338 136.677,110.338 137.792,109.223 139.454,109.223 139.975,108.702 139.975,108.668 140.285,108.357 140.32,108.357 140.768,107.909 140.768,107.875 141.072,107.571 141.107,107.571 141.542,107.135 141.542,106.978 141.82,106.7 143.577,106.7 144.043,106.234 144.043,104.546 144.254,104.336 145.3,104.336 145.628,104.664 145.628,104.821 145.956,105.149 146.79,105.149 147.098,105.457 147.098,105.492 147.543,105.936 149.177,105.936 149.547,106.306 149.547,106.34 149.91,106.703 150.067,106.703 150.33,106.966 150.33,107.923 150.742,108.335 v3(150.742,108.718)
TCK: 1.F9 R200.1 | length 56.5
  Top Layer w0.05: 1.F9@142.342,101.118 v4(142.742,100.718)
  Top Layer w0.1: v1(189.992,109.982) R200.1@189.992,110.675
  Layer 4 w0.1: v4@142.742,100.725 142.742,100.297 143.419,99.62 144.215,99.62 144.218,99.618 154.066,99.618 154.069,99.62 154.38,99.62 155.067,98.933 156.337,98.933 156.845,98.425 157.861,98.425 v1(159.504,100.068)
  Layer 3 w0.1: v1(159.504,100.068) 159.766,100.33 161.163,100.33 161.671,100.838 161.671,104.031 167.749,110.109 178.766,110.109 178.893,109.982 v1(189.992,109.982)
TCK_JTAG: P9.4 R200.2 U23.4 | length 5
  Top Layer w0.1: R200.2@189.992,111.575 P9.4@189.992,113.284
  Bottom Layer w0.1: P9.4@189.992,113.284 191.513,114.805 U23.4@192.7,114.805
TDI_JTAG: P9.2 R197.2 U23.2 | length 3.7
  Top Layer w0.1: R197.2@195.072,111.575 P9.2@195.072,113.284
  Bottom Layer w0.1: U23.2@194,114.805 194,114.356 P9.2@195.072,113.284
TDI_USB/TDO_FPGA: 1.F6 R199.1 | length 59.8
  Top Layer w0.05: 1.F6@142.342,98.718 v4(142.742,98.318)
  Top Layer w0.1: v1(191.262,108.077) 192.532,109.347 R199.1@192.532,110.675
  Layer 4 w0.1: v4(142.742,98.318) 143.142,97.918 143.142,97.494 143.418,97.218 143.422,97.218 143.425,97.214 153.611,97.214 154.178,96.647 156.972,96.647 157.353,97.028 159.639,97.028 v1(161.058,98.447)
  Layer 3 w0.1: v1(161.058,98.447) 162.074,98.447 163.576,99.949 163.576,103.251 168.402,108.077 v1(191.262,108.077)
TDO_JTAG: P9.3 R199.2 U23.3 | length 3.6
  Top Layer w0.1: R199.2@192.532,111.575 P9.3@192.532,113.284
  Bottom Layer w0.1: P9.3@192.532,113.284 193.35,114.102 U23.3@193.35,114.805
TDO_USB/TDI_FPGA: 1.G6 R197.1 | length 60.3
  Top Layer w0.05: 1.G6@143.142,98.718 v4(143.542,99.118)
  Top Layer w0.1: v1(194.056,109.347) 194.437,109.347 195.072,109.982 R197.1@195.072,110.675
  Layer 4 w0.1: v4(143.542,99.118) 147.567,99.118 147.87,98.814 154.17,98.814 154.686,98.298 156.083,98.298 156.464,97.917 158.496,97.917 v1(160.053,99.474)
  Layer 3 w0.1: v1(160.053,99.474) 161.323,99.474 162.306,100.457 162.306,103.768 168.012,109.474 180.93,109.474 181.057,109.347 v1(194.056,109.347)
TMS: 1.J6 R196.1 | length 60.4
  Top Layer w0.05: 1.J6@144.742,98.718 v4(145.142,98.318)
  Top Layer w0.1: v1(196.215,109.347) 196.596,109.728 R196.1@196.596,110.675
  Layer 4 w0.1: v4@145.142,98.325 145.166,98.3 145.413,98.3 145.796,97.917 153.924,97.917 154.351,97.49 159.085,97.49 v1(160.543,98.948)
  Layer 3 w0.1: v1(160.543,98.948) 161.813,98.948 162.941,100.076 162.941,103.514 168.139,108.712 195.58,108.712 v1(196.215,109.347)
TMS_JTAG: P9.1 R196.2 U23.1 | length 5.7
  Top Layer w0.1: R196.2@196.596,111.575 196.596,112.268 P9.1@197.612,113.284
  Bottom Layer w0.1: U23.1@194.65,114.805 196.091,114.805 P9.1@197.612,113.284
UART_RXD_OUT: 1.B12 | length 0.6
  Top Layer w0.05: 1.B12@139.142,103.518 v2(139.542,103.918)
UART_TXD_IN: 1.C12 | length 0.6
  Top Layer w0.1: v2@139.549,103.121 1.C12@139.942,103.515
  other v2: 139.549,103.118
USB5V0: C232.2 J8.1 J9.1 P7.1 P8.1 R189.2
USB_CLK_12M: U20.26 | length 1.2
  Top Layer w0.1: v1(103.252,62.388) 103.264,62.4 103.264,63.613 U20.26@103.276,63.625
VCC1V0: 1.G7 1.G11 1.G13 1.H10 1.H12 1.J7 1.J13 1.K12 1.L7 1.L13 1.M12 1.N7 1.N13 1.P8 1.P12 1.R7 1.R13 C8.2 C108.2 C109.2 C110.2 C111.1 C135.2 C136.2 C137.2 C138.2 C139.2 C140.1 C141.2 C142.2 C143.2 C144.2 C145.2 C146.1 C147.2 C148.2 C149.2 FB8.1 R284.1 U27.14 | length 10.5
  Top Layer w0.05: v2(142.742,103.118) 1.G11@143.142,102.718 ; v2(142.742,104.718) 1.G13@143.142,104.318 ; 1.G7@143.142,99.518 v2(143.542,99.918) ; v2(143.542,102.318) 1.H10@143.942,101.918 ; v2(143.542,103.118) 1.H12@143.942,103.518 ; v2(144.342,103.918) 1.J13@144.742,104.318 ; 1.J7@144.742,99.518 v2(145.142,99.918) ; v2(145.142,103.118) 1.K12@145.542,103.518 ; v2(145.942,104.718) 1.L13@146.342,104.318 ; 1.L7@146.342,99.518 v2(146.742,99.918) ; v2(146.742,103.918) 1.M12@147.142,103.518 ; v2(147.542,104.718) 1.N13@147.942,104.318 ; 1.N7@147.942,99.518 v2(148.342,99.918) ; v2(148.342,103.918) 1.P12@148.742,103.518 ; 1.P8@148.742,100.318 v2(149.142,100.718) ; v2(149.142,104.718) 1.R13@149.542,104.318 ; 1.R7@149.542,99.518 v2(149.942,99.918)
  Bottom Layer w0.1: v1(164.077,96.462) 164.887,96.462 U27.14@164.927,96.502
VCC1V8: 1.F8 1.G9 1.H8 1.J11 1.K8 1.L11 1.M8 1.N9 1.N11 1.P10 1.R9 C125.2 C126.2 C127.2 C128.1 C150.2 C151.2 C152.2 C153.2 C154.2 C155.1 FB7.1 R188.2 R267.2 R280.1 R296.1 | length 6.2
  Top Layer w0.05: v2(141.942,100.718) 1.F8@142.342,100.318 ; 1.G9@143.142,101.118 v2(143.542,101.518) ; 1.H8@143.942,100.318 v2(144.342,100.718) ; 1.J11@144.742,102.718 v2(145.142,102.318) ; 1.K8@145.542,100.318 v2(145.942,100.718) ; v2(145.942,103.118) 1.L11@146.342,102.718 ; 1.M8@147.142,100.318 v2(147.542,100.718) ; v2(147.542,103.118) 1.N11@147.942,102.718 ; 1.N9@147.942,101.118 v2(148.342,101.518) ; 1.P10@148.742,101.918 v2(149.142,102.318) ; 1.R9@149.542,101.118 v2(149.942,101.518)
VCC1V8_IO: 1.A13 1.B16 1.D12 1.E15 C19.2 C23.2 C24.2 C68.2 C129.2 C130.2 C131.2 C132.1 C133.2 C134.2 FB2.1 IC2.5 R117.2 R187.2 R233.1 R249.2 SW1.3 SW1.4 SW2.3 SW2.4 U20.11 U20.32 | length 5.7
  Top Layer w0.05: 1.A13@138.342,104.318 v2(138.742,103.918) ; v2(138.742,107.118) 1.B16@139.142,106.718 ; v2(140.342,103.918) 1.D12@140.742,103.518 ; v2(141.142,106.318) 1.E15@141.542,105.918
  Top Layer w0.1: U20.32@106.276,63.625 v1(107.013,63.625) ; v1(172.053,128.556) IC2.5@172.053,129.323
  Bottom Layer w0.1: C68.2@106.427,63.437 106.58,63.59 106.978,63.59 v1(107.013,63.625) 107.013,62.397 R187.2@107.004,62.388
VCC1V35: 1.A3 1.D2 1.E5 1.G1 1.H4 1.L3 1.P2 1.R5 1.U1 1.V4 C86.2 C87.2 C88.2 C89.2 C90.2 C91.2 C92.2 C94.1 C95.1 C96.2 C97.2 C98.2 C158.2 C159.2 C162.2 C163.2 C164.2 C165.2 C166.2 C167.2 C168.2 C169.2 C170.2 C171.2 C172.2 C173.2 C174.2 C175.2 C176.2 C177.2 C178.2 C179.2 C180.2 C181.2 C182.2 C183.2 C184.2 C185.2 C186.2 C187.2 C188.2 C189.2 C190.2 C191.2 C192.2 C193.2 C194.2 C195.2 C196.2 C197.2 C198.2 C199.2 R232.1 R248.2 R290.1 U25.A1 U25.A8 U25.B2 U25.C1 U25.C9 U25.D2 U25.D9 U25.E9 U25.F1 U25.G7 U25.H2 U25.H9 U25.K2 U25.K8 U25.N1 U25.N9 U25.R1 U25.R9 U26.A1 U26.A8 U26.B2 U26.C1 U26.C9 U26.D2 U26.D9 U26.E9 U26.F1 U26.G7 U26.H2 U26.H9 U26.K2 U26.K8 U26.N1 U26.N9 U26.R1 U26.R9 | length 25.2
  Top Layer w0.05: 1.A3@138.342,96.318 v2(138.742,95.918) ; v2(140.342,95.918) 1.D2@140.742,95.518 ; 1.E5@141.542,97.918 v2(141.942,98.318) ; 1.G1@143.142,94.718 v3(143.542,95.118) ; v2(143.542,96.718) 1.H4@143.942,97.118 ; 1.L3@146.342,96.318 v2(146.742,95.918) ; v2(148.342,95.918) 1.P2@148.742,95.518 ; 1.R5@149.542,97.918 v2(149.942,98.318) ; v2(150.742,95.118) 1.U1@151.142,94.718 ; 1.V4@151.942,97.118 v2(152.342,96.718)
  Top Layer w0.254: v6@142.693,64.123 U25.R1@143.075,64.505 ; v6@142.693,65.723 U25.N1@143.075,66.105 ; v6@142.693,71.323 U25.F1@143.075,71.705 ; v6@142.693,74.524 U25.C1@143.075,74.142 ; v6@142.693,76.124 U25.A1@143.075,75.742 ; v6@143.493,68.924 U25.K2@143.875,68.542 ; v6@143.493,69.723 U25.H2@143.875,70.105 ; v6@143.493,72.923 U25.D2@143.875,73.305 ; v10@143.493,75.324 U25.B2@143.875,74.942 ; U25.G7@147.894,70.942 v6@148.275,71.324 ; U25.A8@148.694,75.742 v10@149.075,76.124 ; U25.K8@148.712,68.542 v6@149.094,68.924 ; v6@149.112,72.123 U25.E9@149.494,72.505 ; U25.N9@149.494,66.142 v6@149.875,66.524 ; U25.C9@149.494,74.142 v10@149.875,74.524 ; U25.R9@149.512,64.524 v6@149.894,64.142 ; U25.H9@149.512,70.124 v6@149.894,69.742 ; U25.D9@149.512,73.324 v6@149.894,72.942 ; v6@164.116,64.196 U26.R1@164.498,64.577 ; v6@164.116,65.796 U26.N1@164.498,66.177 ; v10@164.116,71.396 U26.F1@164.498,71.777 ; v10@164.116,74.596 U26.C1@164.498,74.215 ; v10@164.116,76.196 U26.A1@164.498,75.815 ; v6@164.876,70.636 U26.H2@165.316,70.196 ; v6@164.916,68.996 U26.K2@165.298,68.615 ; v10@164.916,75.396 U26.B2@165.298,75.015 ; U26.D2@165.335,73.415 v10@165.717,73.796 ; U26.G7@169.335,70.977 v6@169.717,70.596 ; U26.K8@170.135,68.615 v6@170.516,68.996 ; U26.A8@170.135,75.815 v10@170.516,76.196 ; v10@170.516,72.996 U26.D9@170.898,73.377 ; U26.R9@170.935,64.615 v6@171.317,64.996 ; U26.N9@170.935,66.215 v6@171.317,66.596 ; U26.H9@170.935,70.215 v6@171.317,70.596 ; U26.E9@170.935,72.577 v10@171.317,72.196 ; U26.C9@170.935,74.177 v10@171.317,73.796
  other v6: 142.675,64.123 149.913,64.142 164.097,64.196 171.335,64.996 142.675,65.723 164.097,65.796 149.875,66.543 171.335,66.596 143.493,68.943 149.113,68.924 170.535,68.996 164.916,69.015 143.475,69.723 149.913,69.742 169.717,70.577 171.335,70.596 164.876,70.641 142.675,71.323 148.275,71.343 149.112,72.105 143.475,72.923 149.913,72.942 142.693,74.543 142.693,76.143
  other v10: 164.097,71.396 171.317,72.177 170.497,72.996 165.735,73.796 171.317,73.777 149.875,74.543 164.116,74.615 143.493,75.343 164.916,75.415 149.075,76.143 170.535,76.196 164.116,76.215
VCC3V3: 1.B6 1.C19 1.D7 1.F18 1.H14 1.J17 1.K6 1.K20 1.M6 1.M16 1.N6 1.N19 1.R6 1.R15 1.T6 1.T8 1.T18 1.U11 1.V14 1.W7 1.W17 1.Y10 1.Y20 C15.2 C16.2 C20.2 C21.2 C53.2 C55.2 C56.2 C58.2 C59.2 C60.2 C61.2 C62.2 C63.2 C64.2 C71.2 C72.2 C73.2 C81.2 C93.1 C99.2 C100.2 C101.2 C102.2 C103.2 C104.2 C105.2 C106.2 C107.1 C112.2 C113.2 C114.2 C115.2 C116.2 C117.2 C118.2 C119.2 C120.1 C121.2 C122.2 C123.2 C124.1 C205.2 C228.2 C229.2 D1.1 D18.1 DS7.1 DS8.1 DS11.1 FB1.1 FB5.1 IC2.17 IC2.21 IC3.1 IC4.2 J1.15 P1.6 P1.12 P2.6 P2.12 P3.6 P3.12 P4.6 P4.12 P5.6 P5.12 P6.6 P6.12 P9.6 P11.1 P12.4 P13.1 R89.1 R90.2 R91.1 R106.1 R107.1 R115.1 R120.2 R132.1 R133.1 R138.1 R141.1 R142.1 R143.1 R144.1 R145.1 R146.1 R147.1 R148.1 R150.1 R151.1 R152.1 R158.2 R159.2 R160.2 R161.2 R162.2 R163.2 R164.2 R165.2 R166.1 R167.2 R168.2 R169.2 R175.2 R176.2 R177.2 R178.2 R179.2 R180.2 R181.2 R182.2 R183.2 R184.2 R190.1 R198.2 R201.2 R202.2 R203.2 R204.2 R243.1 R250.1 R278.1 R293.1 SD1.4 SW3.1 SW4.3 SW4.4 SW5.3 SW5.4 SW6.1 SW7.3 SW7.4 SW8.1 SW9.3 SW9.4 SW10.1 U17.5 U19.4 U19.11 U19.17 U19.24 U19.27 U19.34 U19.40 U20.20 U20.21 U22.8 U24.8 U27.8 U29.3 Y3.1 Y3.6 | length 17.8
  Top Layer w0.05: v2(138.742,99.118) 1.B6@139.142,98.718 ; 1.C19@139.942,109.118 v2(140.342,109.518) ; v2(140.342,99.918) 1.D7@140.742,99.518 ; 1.F18@142.342,108.318 v2(142.742,108.718) ; 1.H14@143.942,105.118 v2(144.342,104.718) ; v2(144.342,107.118) 1.J17@144.742,107.518 ; 1.K6@145.542,98.718 v2(145.942,98.318) ; 1.K20@145.542,109.918 v2(145.942,109.518) ; 1.M16@147.142,106.718 v2(147.542,107.118) ; 1.N6@147.942,98.718 v2(148.342,99.118) ; 1.N19@147.942,109.118 v2(148.342,109.518) ; 1.R15@149.542,105.918 v2(149.942,105.518) ; 1.T6@150.342,98.718 v2(150.742,99.118) ; 1.T8@150.342,100.318 v2(150.742,100.718) ; 1.T18@150.342,108.318 v2(150.742,107.918) ; v2(150.742,103.118) 1.U11@151.142,102.718 ; 1.V14@151.942,105.118 v2(152.342,104.718) ; 1.W7@152.742,99.518 v2(153.142,99.118) ; 1.W17@152.742,107.518 v2(153.142,107.118) ; v2(153.142,109.518) 1.Y20@153.542,109.918
  Top Layer w0.1: C71.2@100.331,66.673 100.502,66.502 100.693,66.502 100.743,66.452 v1(101.093,66.452) 101.115,66.474 101.885,66.474 U20.20@101.906,66.495 U20.21@101.906,65.995 ; v1(168.529,131.521) 169.351,131.521 IC2.21@169.353,131.523 ; C59.2@180.213,123.477 180.307,123.571 v1(180.848,123.571) 180.928,123.651 U19.4@181.585,123.651
  Top Layer w0.254: 1.M6@147.142,98.718 1.N6@147.942,98.718 ; 1.R6@149.542,98.718 149.595,98.718 149.677,98.8 1.T6@150.207,98.8 ; v2(153.138,101.517) 1.Y10@153.541,101.918
  other v2: 149.942,104.718
VCC5V0: C69.2 C77.2 C200.1 C201.1 C202.1 C203.1 D16.2 F1.1 FB6.1 P15.1 R71.1 R72.1 R73.1 R75.1 R77.1 R78.1 R283.1 R304.2 U21.5 U27.4 U27.9 U27.24 U27.25 U27.35 U27.36 U28.4 U28.5 U28.6 U28.7 U28.8 | length 17.7
  Top Layer w0.1: v1(195.326,82.55) F1.1@195.326,83.59
  Bottom Layer w0.1: U28.8@136.965,163.328 136.965,162.069 137.338,161.696 ; U28.7@137.465,163.328 137.465,161.823 137.338,161.696 ; U28.6@138.193,164.056 138.575,164.056 139.792,162.839 139.878,162.839 ; U28.5@138.193,164.556 139.685,164.556 139.878,164.363 ; U28.4@138.193,165.056 139.439,165.056 139.878,164.617 139.878,164.363 ; v1(164.948,102.032) 164.948,101.525 U27.24@164.971,101.502 ; v1(165.329,102.921) 165.599,102.65 165.599,102.229 U27.25@165.649,102.18 ; U27.4@169.605,95.28 169.605,94.496 v1(169.69,94.41) ; 137.338,161.696 139.116,161.696 139.878,162.458 139.878,162.839 ; 139.878,162.839 139.878,164.363
  other v1: 104.649,72.675
VCC5V0_FAN: C76.2 D15.1 D16.1 P10.2 | length 9.8
  Top Layer w0.1: P10.2@167.64,121.615 167.747,121.508 167.747,120.69 C76.2@170.437,118 ; C76.2@170.437,117.5 C76.2@170.437,118 ; D16.1@173.38,120.498 D15.1@171.983,120.498 171.983,119.547 C76.2@170.437,118
VCCPLL: 1.G8 C156.2 C157.2 FB7.2 | length 0.6
  Top Layer w0.05: 1.G8@143.142,100.318 v2(143.542,100.718)
VDD: C204.2 U27.42
VDD18: C66.2 C67.2 R187.1 R188.1 R194.2 U20.28 U20.30 | length 6.6
  Top Layer w0.1: v1(104.276,62.888) U20.28@104.276,63.625 ; v1(105.276,62.888) U20.30@105.276,63.625
  Bottom Layer w0.1: C67.2@104.268,63.437 104.276,63.429 v1(104.276,62.888) v1(105.276,62.888) ; R194.2@105.099,61.372 R188.1@106.104,61.372 R187.1@106.104,62.388 105.926,62.566 105.598,62.566 v1(105.276,62.888) ; C66.2@105.284,63.437 105.276,63.429 v1(105.276,62.888)
VIDEO_SHIELD: C54.2 J6.Shell J7.Shell R140.1
VJACK: J10.1 P15.3 R307.2 | length 0.8
  Bottom Layer w0.1: R307.2@130.411,173.634 130.411,174.119 130.607,174.315 v1(130.607,174.396)
VP: 1.K9 R305.1 U28.19 | length 2.4
  Top Layer w0.05: 1.K9@145.542,101.118 v2(145.942,101.518)
  Bottom Layer w0.1: R305.1@136.957,169.12 136.965,169.112 U28.19@136.965,167.284
VREF0V9: 1.E11 C80.2 R233.2 R240.1 | length 8.7
  Top Layer w0.05: v5(141.142,102.318) 1.E11@141.542,102.718
  Layer 6 w0.1: v12(135.763,103.124) 137.074,103.124 137.455,102.743 140.712,102.743 v5@141.138,102.317
  Bottom Layer w0.1: C80.2@133.35,103.03 134.214,103.03 R240.1@134.239,103.055 R233.2@135.128,103.055 135.197,103.124 v12(135.763,103.124)
VREG: C207.2 R271.2 U27.44 | length 0.9
  Bottom Layer w0.1: U27.44@171.827,97.958 U27.44@171.805,97.98 171.811,97.974 172.689,97.974 v1(172.695,97.968)
VU5V0: C226.2 P15.2 R273.1 R301.2 R302.2 U28.9 U28.10 U28.11 U28.12 U28.13 | length 20.4
  Bottom Layer w0.1: v1(131.369,167.96) R301.2@132.102,167.96 ; R301.2@132.189,168.046 R301.2@132.102,167.96 ; U28.11@135.237,164.056 134.237,164.056 133.909,163.728 ; U28.12@135.237,164.556 134.102,164.556 133.909,164.363 ; U28.13@135.237,165.056 134.221,165.056 133.909,164.744 133.909,164.363 ; U28.10@135.965,163.328 135.965,162.355 135.687,162.077 ; U28.9@136.465,163.328 136.465,162.347 136.195,162.077 135.687,162.077 ; R302.2@137.846,170.02 v1(137.846,170.881) ; R301.2@132.102,167.96 131.714,167.571 131.714,163.734 132.339,163.109 132.639,163.109 133.893,163.109 133.909,163.093 ; 133.909,163.093 133.909,163.728 ; 133.909,163.093 133.909,162.458 134.29,162.077 135.687,162.077 ; 133.909,163.728 133.909,164.363
XADC_1V8: 1.J9 C75.2 C225.2 R299.2 U27.7 | length 7.3
  Top Layer w0.05: 1.J9@144.742,101.118 v2(145.142,101.518)
  Bottom Layer w0.1: U27.7@168.127,95.302 168.127,93.519 168.377,93.269 168.377,90.106 C225.2@168.365,90.094 168.827,90.094 R299.2@169.52,90.787
XADC_1V25: 1.L9 C74.2 C230.2 U29.4 | length 0.6
  Top Layer w0.05: 1.L9@146.342,101.118 v2(146.742,101.518)
pads on no net: 1.T5 1.T9 1.U8 1.U9 1.V7 1.V11 1.W6 1.W8 1.W9 1.W10 1.Y6 1.Y13 IC1.30 IC2.8 IC2.10 IC2.12 IC2.13 IC2.14 IC2.15 IC3.9 IC3.20 IC3.21 IC3.22 IC3.23 IC3.24 IC3.25 IC3.26 IC3.27 IC3.28 IC3.29 IC3.30 IC3.39 IC3.40 IC4.7 J2. J2.9 J4.3 J6.14 J7.14 SW13.1 U15.6 U15.16 U15.17 U16.4 U17.1 U17.6 U20.12 U20.15 U20.16 U20.25 U22.1 U22.2 U22.3 U22.6 U22.7 U25.J1 U25.J9 U25.L1 U25.L9 U25.M7 U26.J1 U26.J9 U26.L1 U26.L9 U26.M7 U28.3 U29.1 U29.5 U29.6 Y3.2 Y3.5
copper on no net: | length 0.2
  Top Layer w0.1: v1@100.585,68.203 v1(100.712,68.33)
  other v1: 100.204,68.33

## Polygon pours and split planes (outlines as drawn)
VCC1V35 on Bottom Layer "VCC1V35_L08_P002" (solid, pour order 2): 149.073,97.282 149.403,97.612 149.403,98.374 149.708,98.679 153.416,98.679 153.797,98.298 153.797,94.996 152.933,94.132 138.506,94.132 137.897,94.742 137.897,97.79 138.024,97.917 140.716,97.917 141.326,98.527 142.316,98.527 142.596,98.247 142.596,97.511 142.824,97.282
VCC1V8 on Bottom Layer "VCC1V8" (solid, pour order 0): 144.189,103.372 143.942,103.124 143.942,102.21 143.548,101.816 142.974,101.816 142.412,101.254 142.412,100.633 142.588,100.457 147.878,100.457 148.393,100.972 149.893,100.972 150.144,101.222 150.144,101.618 148.391,103.372
VCC1V0 on Bottom Layer "VCC1V35" (solid, pour order 1): 143.459,99.289 144.018,99.289 144.424,98.882 146.482,98.882 146.888,99.289 150.317,99.289 150.47,99.441 150.47,102.641 149.581,103.53 149.581,105.105 149.377,105.308 142.621,105.308 142.24,104.927 142.24,101.219 143.129,100.33 143.129,99.619
VCC1V8_IO on Bottom Layer "VCC1V35" (solid, pour order 3): 141.732,106.426 141.351,106.807 140.335,106.807 139.7,107.442 138.176,107.442 137.922,107.188 137.922,103.759 138.176,103.505 140.462,103.505 140.716,103.759 140.716,104.394 141.732,105.41
VCC3V3 on Bottom Layer "VCC1V35" (solid, pour order 4): 149.073,97.282 149.403,97.612 149.403,98.374 149.708,98.679 153.416,98.679 153.797,99.06 153.797,109.855 153.416,110.236 139.573,110.236 139.192,109.855 139.192,107.95 140.335,106.807 141.351,106.807 141.732,106.426 141.732,105.41 140.716,104.394 140.716,103.759 140.462,103.505 138.176,103.505 137.922,103.251 137.922,98.679 138.684,97.917 140.716,97.917 141.326,98.527 142.316,98.527 142.596,98.247 142.596,97.511 142.824,97.282
VCC1V35 on Top Layer "VCC1V35" (solid, pour order 7): 152.935,78.842 140.489,78.842 139.473,77.826 139.473,62.586 140.489,61.57 153.062,61.57 153.951,62.459 153.951,77.826
VCC1V35 on Top Layer "VCC1V35_L01_P008" (solid, pour order 8): 173.638,78.598 161.192,78.598 160.176,77.582 160.176,62.342 161.192,61.326 173.765,61.326 174.654,62.215 174.654,77.582
GND on Layer 2 "GND_L2" (solid, remove dead copper, pour order 9): 87.122,53.859 87.122,141.859 209.122,141.859 209.122,53.859
GND on Layer 5 "GND_L5" (solid, remove dead copper, pour order 10): 87.122,53.859 87.122,141.859 209.122,141.859 209.122,53.859
GND on Layer 7 "GND_L7" (solid, remove dead copper, pour order 11): 87.122,53.859 87.122,141.859 209.122,141.859 209.122,53.859

## Silkscreen, mask and mechanical layers (free items; w line width, h text height)
Top Overlay:
  the board outline again, w0.254
Top 3D Body:
  drawing of 223 lines, arcs and shapes, not listed
Top Component Outline:
  drawing of 1709 lines, arcs and shapes, not listed